# Altium PCB Lamps_buttons.PcbDoc
Units mm, origin at the board's own origin, x right, y up, seen from the top; angles counter-clockwise.
Board outline 106 x 20 mm, 2 copper layers (Top Layer, Bottom Layer), stack 1.671 mm thick; 12 components, 6 nets, 48 pads, 4 vias.
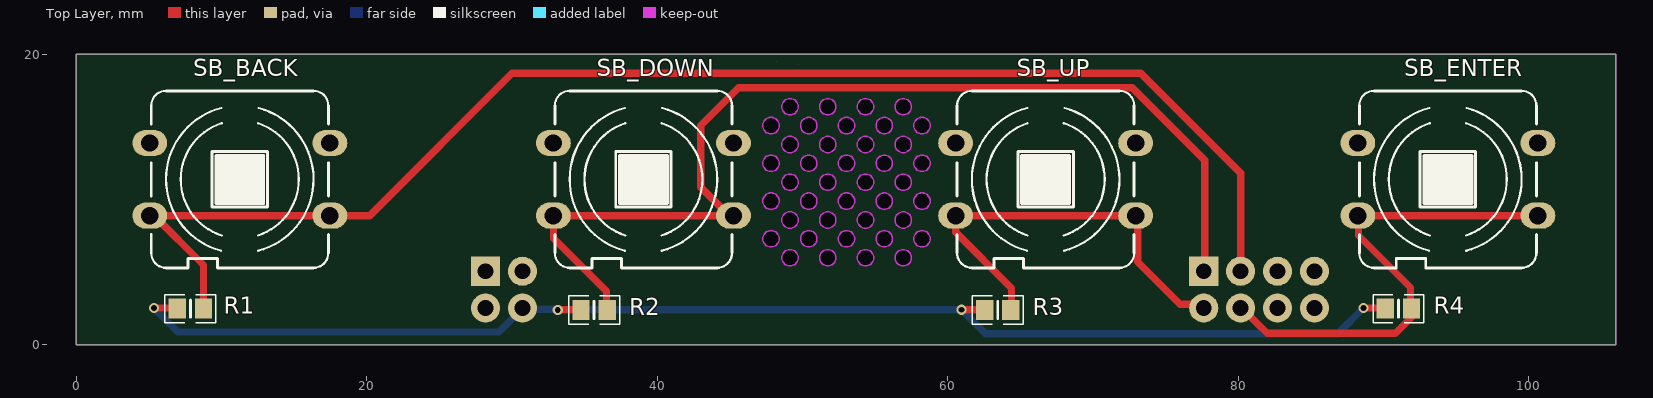
[diagram p0: Top Layer view]
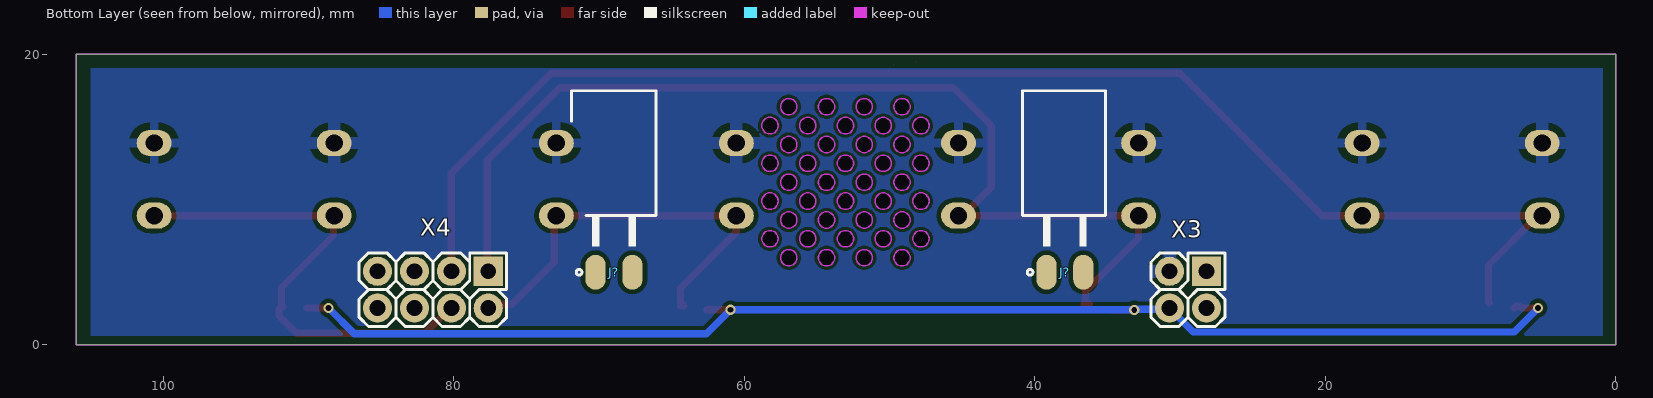
[diagram p1: Bottom Layer view, seen from below]
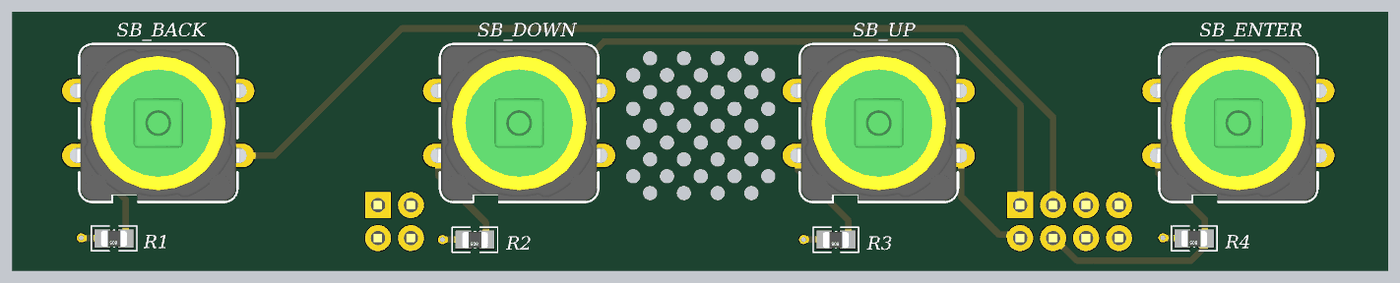
[diagram p2: 3D render of the assembled board from above, using the file's embedded part models]
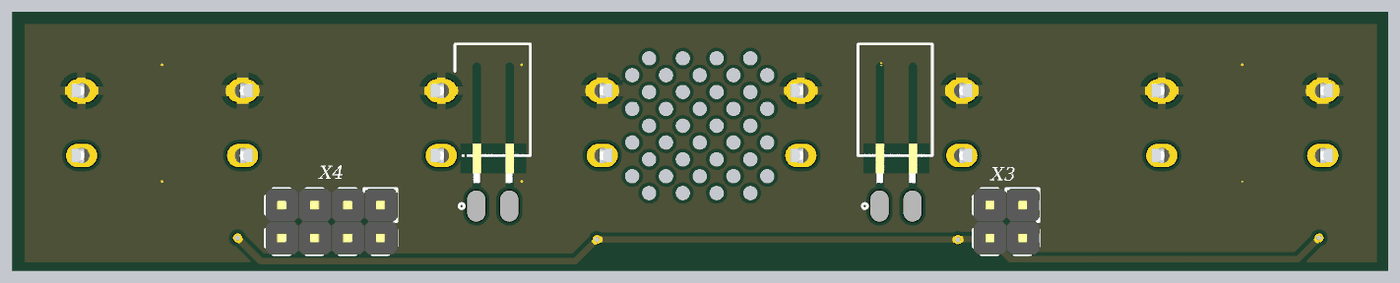
[diagram p3: 3D render of the assembled board from below, using the file's embedded part models]

## Layer stack, top to bottom
Top Solder: solder mask 0.0102, Solder Resist, Dk 3.5
Top Layer: signal copper 0.0356
Dielectric 1: dielectric 1.6, FR-4, Dk 4.8
Bottom Layer: signal copper 0.0356
Bottom Solder: solder mask 0.0102, Solder Resist, Dk 3.5

## Board outline
0,0 0,20 106,20 106,0
cut-out: 47.279,15.1 cw(c47.84,15.1) 47.84,15.66 cw(c47.84,15.1) 48.4,15.1 cw(c47.84,15.1) 47.84,14.54 cw(c47.84,15.1)
cut-out: 49.879,15.1 cw(c50.44,15.1) 50.44,15.66 cw(c50.44,15.1) 51,15.1 cw(c50.44,15.1) 50.44,14.54 cw(c50.44,15.1)
cut-out: 52.479,15.1 cw(c53.04,15.1) 53.04,15.66 cw(c53.04,15.1) 53.6,15.1 cw(c53.04,15.1) 53.04,14.54 cw(c53.04,15.1)
cut-out: 55.079,15.1 cw(c55.64,15.1) 55.64,15.66 cw(c55.64,15.1) 56.2,15.1 cw(c55.64,15.1) 55.64,14.54 cw(c55.64,15.1)
cut-out: 57.679,15.1 cw(c58.24,15.1) 58.24,15.66 cw(c58.24,15.1) 58.8,15.1 cw(c58.24,15.1) 58.24,14.54 cw(c58.24,15.1)
cut-out: 48.579,16.4 cw(c49.14,16.4) 49.14,16.96 cw(c49.14,16.4) 49.7,16.4 cw(c49.14,16.4) 49.14,15.84 cw(c49.14,16.4)
cut-out: 51.179,16.4 cw(c51.74,16.4) 51.74,16.96 cw(c51.74,16.4) 52.3,16.4 cw(c51.74,16.4) 51.74,15.84 cw(c51.74,16.4)
cut-out: 53.779,16.4 cw(c54.34,16.4) 54.34,16.96 cw(c54.34,16.4) 54.9,16.4 cw(c54.34,16.4) 54.34,15.84 cw(c54.34,16.4)
cut-out: 56.379,16.4 cw(c56.94,16.4) 56.94,16.96 cw(c56.94,16.4) 57.5,16.4 cw(c56.94,16.4) 56.94,15.84 cw(c56.94,16.4)
cut-out: 48.579,11.2 cw(c49.14,11.2) 49.14,11.76 cw(c49.14,11.2) 49.7,11.2 cw(c49.14,11.2) 49.14,10.64 cw(c49.14,11.2)
cut-out: 51.179,11.2 cw(c51.74,11.2) 51.74,11.76 cw(c51.74,11.2) 52.3,11.2 cw(c51.74,11.2) 51.74,10.64 cw(c51.74,11.2)
cut-out: 53.779,11.2 cw(c54.34,11.2) 54.34,11.76 cw(c54.34,11.2) 54.9,11.2 cw(c54.34,11.2) 54.34,10.64 cw(c54.34,11.2)
cut-out: 56.379,11.2 cw(c56.94,11.2) 56.94,11.76 cw(c56.94,11.2) 57.5,11.2 cw(c56.94,11.2) 56.94,10.64 cw(c56.94,11.2)
cut-out: 55.079,12.5 cw(c55.64,12.5) 55.64,13.06 cw(c55.64,12.5) 56.2,12.5 cw(c55.64,12.5) 55.64,11.94 cw(c55.64,12.5)
cut-out: 52.479,12.5 cw(c53.04,12.5) 53.04,13.06 cw(c53.04,12.5) 53.6,12.5 cw(c53.04,12.5) 53.04,11.94 cw(c53.04,12.5)
cut-out: 49.879,12.5 cw(c50.44,12.5) 50.44,13.06 cw(c50.44,12.5) 51,12.5 cw(c50.44,12.5) 50.44,11.94 cw(c50.44,12.5)
cut-out: 47.279,12.5 cw(c47.84,12.5) 47.84,13.06 cw(c47.84,12.5) 48.4,12.5 cw(c47.84,12.5) 47.84,11.94 cw(c47.84,12.5)
cut-out: 57.679,12.5 cw(c58.24,12.5) 58.24,13.06 cw(c58.24,12.5) 58.8,12.5 cw(c58.24,12.5) 58.24,11.94 cw(c58.24,12.5)
cut-out: 56.379,13.8 cw(c56.94,13.8) 56.94,14.36 cw(c56.94,13.8) 57.5,13.8 cw(c56.94,13.8) 56.94,13.24 cw(c56.94,13.8)
cut-out: 53.779,13.8 cw(c54.34,13.8) 54.34,14.36 cw(c54.34,13.8) 54.9,13.8 cw(c54.34,13.8) 54.34,13.24 cw(c54.34,13.8)
cut-out: 51.179,13.8 cw(c51.74,13.8) 51.74,14.36 cw(c51.74,13.8) 52.3,13.8 cw(c51.74,13.8) 51.74,13.24 cw(c51.74,13.8)
cut-out: 48.579,13.8 cw(c49.14,13.8) 49.14,14.36 cw(c49.14,13.8) 49.7,13.8 cw(c49.14,13.8) 49.14,13.24 cw(c49.14,13.8)
cut-out: 48.579,8.6 cw(c49.14,8.6) 49.14,9.16 cw(c49.14,8.6) 49.7,8.6 cw(c49.14,8.6) 49.14,8.04 cw(c49.14,8.6)
cut-out: 51.179,8.6 cw(c51.74,8.6) 51.74,9.16 cw(c51.74,8.6) 52.3,8.6 cw(c51.74,8.6) 51.74,8.04 cw(c51.74,8.6)
cut-out: 53.779,8.6 cw(c54.34,8.6) 54.34,9.16 cw(c54.34,8.6) 54.9,8.6 cw(c54.34,8.6) 54.34,8.04 cw(c54.34,8.6)
cut-out: 56.379,8.6 cw(c56.94,8.6) 56.94,9.16 cw(c56.94,8.6) 57.5,8.6 cw(c56.94,8.6) 56.94,8.04 cw(c56.94,8.6)
cut-out: 55.079,9.9 cw(c55.64,9.9) 55.64,10.46 cw(c55.64,9.9) 56.2,9.9 cw(c55.64,9.9) 55.64,9.34 cw(c55.64,9.9)
cut-out: 52.479,9.9 cw(c53.04,9.9) 53.04,10.46 cw(c53.04,9.9) 53.6,9.9 cw(c53.04,9.9) 53.04,9.34 cw(c53.04,9.9)
cut-out: 49.879,9.9 cw(c50.44,9.9) 50.44,10.46 cw(c50.44,9.9) 51,9.9 cw(c50.44,9.9) 50.44,9.34 cw(c50.44,9.9)
cut-out: 47.279,9.9 cw(c47.84,9.9) 47.84,10.46 cw(c47.84,9.9) 48.4,9.9 cw(c47.84,9.9) 47.84,9.34 cw(c47.84,9.9)
cut-out: 57.679,9.9 cw(c58.24,9.9) 58.24,10.46 cw(c58.24,9.9) 58.8,9.9 cw(c58.24,9.9) 58.24,9.34 cw(c58.24,9.9)
cut-out: 57.679,7.3 cw(c58.24,7.3) 58.24,7.86 cw(c58.24,7.3) 58.8,7.3 cw(c58.24,7.3) 58.24,6.74 cw(c58.24,7.3)
cut-out: 47.279,7.3 cw(c47.84,7.3) 47.84,7.86 cw(c47.84,7.3) 48.4,7.3 cw(c47.84,7.3) 47.84,6.74 cw(c47.84,7.3)
cut-out: 49.879,7.3 cw(c50.44,7.3) 50.44,7.86 cw(c50.44,7.3) 51,7.3 cw(c50.44,7.3) 50.44,6.74 cw(c50.44,7.3)
cut-out: 52.479,7.3 cw(c53.04,7.3) 53.04,7.86 cw(c53.04,7.3) 53.6,7.3 cw(c53.04,7.3) 53.04,6.74 cw(c53.04,7.3)
cut-out: 55.079,7.3 cw(c55.64,7.3) 55.64,7.86 cw(c55.64,7.3) 56.2,7.3 cw(c55.64,7.3) 55.64,6.74 cw(c55.64,7.3)
cut-out: 56.379,6 cw(c56.94,6) 56.94,6.56 cw(c56.94,6) 57.5,6 cw(c56.94,6) 56.94,5.44 cw(c56.94,6)
cut-out: 53.779,6 cw(c54.34,6) 54.34,6.56 cw(c54.34,6) 54.9,6 cw(c54.34,6) 54.34,5.44 cw(c54.34,6)
cut-out: 51.179,6 cw(c51.74,6) 51.74,6.56 cw(c51.74,6) 52.3,6 cw(c51.74,6) 51.74,5.44 cw(c51.74,6)
cut-out: 48.579,6 cw(c49.14,6) 49.14,6.56 cw(c49.14,6) 49.7,6 cw(c49.14,6) 49.14,5.44 cw(c49.14,6)
cut-out: 48.2,19.5
cut-out: 49.7,19.3

## Design rules (kind name [scope] priority, off if disabled: settings)
BoardOutlineClearance [All] p1: gap=0.2 ignorepadtopadclearanceinfootprint=FALSE
Clearance 3.3V [InNet('3V3')] p1: gap=0.305 ignorepadtopadclearanceinfootprint=FALSE
Clearance Sound [InPadClass('Sound')] p2: gap=0.305 ignorepadtopadclearanceinfootprint=FALSE
Clearance [All] p3: gap=0.2 ignorepadtopadclearanceinfootprint=FALSE
ComponentClearance [All] p1: gap=0.127 collisioncheckmode=3 verticalgap=0.127 showdistances=TRUE
DiffPairsRouting [All] p1: maxlimit=0.254 minlimit=0.127 mostfreqgap=0.127 toplayer_minwidth=0.127 toplayer_maxwidth=25.4 toplayer_prefwidth=0.127 bottomlayer_minwidth=0.127 bottomlayer_maxwidth=25.4 bottomlayer_prefwidth=0.127 maxuncoupledlength=12.7
Height [All] p1: minheight=0 maxheight=1816.048 prefheight=12.7
HoleSize [All] p1: absolutevalues=TRUE maxlimit=6.3 minlimit=0.3 maxpercent=80.000 minpercent=20.000
HoleToHoleClearance [All] p1: gap=0.25 allowstackedmicrovias=FALSE
MinimumAnnularRing [All] p1: minimumring=0.076
MinimumSolderMaskSliver [All] p1: minsoldermaskwidth=0
PlaneClearance [All] p1: clearance=0.127
PlaneConnect PlaneConnectPowerPads [InPadClass('PowerPads')] p1: planeconnectstyle=Direct reliefexpansion=0.508 reliefentries=4 reliefconductorwidth=0.254 reliefairgap=0.254
PlaneConnect [All] p2: pad.planeconnectstyle=Relief pad.reliefexpansion=0.3 pad.reliefentries=4 pad.reliefconductorwidth=0.127 pad.reliefairgap=0.127 via.planeconnectstyle=Direct via.reliefexpansion=0.3 via.reliefentries=4 via.reliefconductorwidth=0.127 via.reliefairgap=0.127
PolygonConnect PolygonConnectPowerPads [All vs (InPadClass('PowerPads'))] p1: connectstyle=Direct reliefconductorwidth=0.254 reliefentries=4 polygonreliefangle="90 Angle" airgapwidth=0.254
PolygonConnect [All] p2: thpad.connectstyle=Relief thpad.reliefconductorwidth=0.635 thpad.reliefentries=4 thpad.polygonreliefangle="90 Angle" thpad.airgapwidth=0.508 smdpad.connectstyle=Relief smdpad.reliefconductorwidth=0.127 smdpad.reliefentries=4 smdpad.polygonreliefangle="90 Angle" smdpad.airgapwidth=0.127 via.connectstyle=Direct via.reliefconductorwidth=0.127 via.reliefentries=4 via.polygonreliefangle="90 Angle" via.airgapwidth=0.127
RoutingVias [All] p1: holewidth=0.3 width=0.6 viastyle="Through Hole" minholewidth=0.3 minwidth=0.6 maxholewidth=0.6 maxwidth=6.6
SilkToSilkClearance [All] p1: silktosilkclearance=0
SilkToSolderMaskClearance [IsPad] p1: minsilkscreentomaskgap=0.127 clearancetoexposedcopper=TRUE
SolderMaskExpansion [All] p1: expansion=0.075
Width [All] p1: maxlimit=25.4 minlimit=0.127 preferedwidth=0.127 minimp=50.000000 maximp=50.000000 favimp=50.000000
20 further rules are at their usual default settings.

## Classes and differential pairs
pad class Sound: J?-1 J?-2 R1-1 R1-2 R2-1 R2-2 R3-1 R3-2 R4-1 R4-2 SB_BACK- SB_BACK-1 SB_BACK-2 SB_BACK-3 SB_BACK-4 SB_DOWN- SB_DOWN-1 SB_DOWN-2 SB_DOWN-3 SB_DOWN-4 SB_ENTER- SB_ENTER-1 SB_ENTER-2 SB_ENTER-3 SB_ENTER-4 SB_UP- SB_UP-1 SB_UP-2 SB_UP-3 SB_UP-4 X3-1 X3-2 X3-3 X3-4 X4-1 X4-2 X4-3 X4-4 X4-5 X4-6 X4-7 X4-8
component class Lamps_buttons: J? R1 R2 R3 R4 SB_BACK SB_DOWN SB_ENTER SB_UP X3 X4

## Components (designator, comment, footprint, x,y, rotation, side; value= is the part's Value field where it differs from the comment)
J? "HDRM2" HDRSE_M_1X2 68.98,5 r180 bottom
J? "HDRM2" HDRSE_M_1X2 37.92,5 r180 bottom
R1 "1k" RESC2012(0805)N 7.85,2.5 r180 top
R2 "1k" RESC2012(0805)N 35.65,2.4 r180 top
R3 "1k" RESC2012(0805)N 63.45,2.4 r180 top
R4 "1k" RESC2012(0805)N 91.05,2.5 r180 top
SB_BACK "EVQ-P7B01P" SWPBT_SPDT_12X12SKHC#1 11.25,11.4 r0 top
SB_DOWN "EVQ-P7B01P" SWPBT_SPDT_12X12SKHC#2 39.05,11.4 r0 top
SB_ENTER "EVQ-P7B01P" SWPBT_SPDT_12X12SKHC#2 94.45,11.4 r0 top
SB_UP "EVQ-P7B01P" SWPBT_SPDT_12X12SKHC#2 66.75,11.4 r0 top
X3 "Connector, 4pin, 2.54mm, 500VAC, 3A" "CON: PLD-4" 29.45,3.8 r0 bottom
X4 "Connector, 8pin, 2.54mm, 500VAC, 3A" "CON: PLD-8" 81.45,3.8 r0 bottom

## Footprints (in the part's own frame and the unit in brackets; to place one, negate y for a bottom-side part, rotate by r counter-clockwise, add the part's x,y. Pads: shape width x height; smd on the part's side, far side on the other; paste and mask are expansions set on the pad)
"CON: PLD-4" [mm]
  rect 2x2 hole 1.1: 1(-1.27,-1.27)
  round 2 hole 1.1: 2(-1.27,1.27) 3(1.27,-1.27) 4(1.27,1.27)
  silkscreen extent -2.54,-2.54 2.54,2.54, body extent -2.59,-2.55 2.49,2.53, height 8.54
"CON: PLD-8" [mm] "PLD-40 8 pin header"
  rect 2x2 hole 1.1: 1(-3.81,-1.27)
  round 2 hole 1.1: 2(-3.81,1.27) 3(-1.27,-1.27) 4(-1.27,1.27) 5(1.27,-1.27) 6(1.27,1.27) 7(3.81,-1.27) 8(3.81,1.27)
  silkscreen extent -5.08,-2.54 5.08,2.54, body extent -5.13,-2.55 5.03,2.53, height 8.54
HDRSE_M_1X2 [mm]
  oval 1.4x2.4 smd mask+0.1: 1(-1.27,0) 2(1.27,0)
  silkscreen extent -2.9,-0.2 2.9,12.5, body extent -2.5,-0.47 2.58,11.07, height 1.54
RESC2012(0805)N [mm] "Chip Resistor, Body 2.0x1.3mm, IPC Medium Density"
  rect 1.2x1.4 smd: 1(-0.9,0) 2(0.9,0)
  silkscreen extent -1.75,-0.97 1.75,0.97, body extent -1,-0.62 1,0.64, height 0.78
SWPBT_SPDT_12X12SKHC#1 [mm] "SWITCH, PUSHBUTTON, THD, SPDT, 12X12X7.3 mm ; 1,000,000 cycles ; 1.27N Force, SKHCBEA010"
  oval 2.4x1.8 hole 1.2 mask+0.1: 1(-6.2,2.5) 2(-6.2,-2.5) 3(6.2,-2.5) 4(6.2,2.5)
  round 0 all layers, no hole: ""(0,-4.5)
  round 0 all layers, no hole mask+0.1: ""(0,4.5)
  silkscreen extent -6.1,-6.1 6.1,6.1, body extent -7,-6 7,6, height 7.33
SWPBT_SPDT_12X12SKHC#2 [mm] "SWITCH, PUSHBUTTON, THD, SPDT, 12X12X7.3 mm ; 1,000,000 cycles ; 1.27N Force, SKHCBEA010"
  oval 2.4x1.8 hole 1.2 mask+0.1: 1(-6.2,2.5) 2(-6.2,-2.5) 3(6.2,-2.5) 4(6.2,2.5)
  round 0 all layers, no hole mask+0.1: ""(0,-4.5) ""(0,4.5)
  silkscreen extent -6.1,-6.1 6.1,6.1, body extent -7,-6 7,6, height 7.33

## Part data
J? J?: library part HDRSE_M_1X2, "CONN, HEADER, Male, pitch: 2.54mm, 2POS, SMD", ASSEMBLY=ASSEMBLY, DESC=DESCRIPTION, MANF=Sullins, MANF_P#=PBC36SAAN, PARAM=PARAM, PRICE=PRICE
R1 R2 R3 R4: library part RESC2012(0805), Package=0805, Part Number=RESC2012(0805)
SB_BACK SB_DOWN SB_ENTER SB_UP: "SWITCH TACTILE SPST-NO 0.05A 12V", Digi-Key Part Number=P16764CT-ND, Package=4pinSMD, HelpURL=https://www.digikey.com/product-detail/en/EVQ-P7B01P/P16764CT-ND/4429457/?itemSeq=274049127, Manufacturer Part Number=EVQ-P7B01P, Part Number=EVQ-P7B01P, Price$=0.16200
X3: library part PBD-4, CurrentMax=3A, Manufacturer=Connfly, VoltageMax=500VAC, CommentText="\"Разъем\"", HelpURL=https://www.chipdip.ru/product/pbd-4, Multichannel=4pin, PartNumber=PBD-4, Pitch=2.54mm, System=Connector, TypeConnector=Connector, ValueManufacturerPartNumber="Connector, 4pin, 2.54mm, 500VAC, 3A"
X4: library part PBD-8, CurrentMax=3A, Manufacturer=Connfly, VoltageMax=500VAC, CommentText="\"Разъем\"", HelpURL=https://www.chipdip.ru/product/pbd-8, Multichannel=8pin, PartNumber=PBD-8, Pitch=2.54mm, System=Connector, TypeConnector=Connector, ValueManufacturerPartNumber="Connector, 8pin, 2.54mm, 500VAC, 3A"

## Via types
v1: diameter 0.7, hole 0.4, Top Layer to Bottom Layer, 4 vias

## Nets (pads, with @x,y where several pads share a name; then routed paths per layer and width w, separated by ;. In a path a pad name is that pad's centre, name@x,y a point inside that pad or via, vN(x,y) a via of type N, cw(c..) or ccw(c..) an arc to the next point about the centre after c; other vN are vias at no path point)
3V3: R1.2 R2.2 R3.2 R4.2 X3.4 | length 92.7
  Top Layer w0.5: v1(5.33,2.54) 6.473,2.54 6.6,2.667 6.843,2.667 R1.2@6.97,2.54 ; v1(33.146,2.41) 34.78,2.41 R2.2@34.783,2.413 ; v1(60.956,2.413) R3.2@62.596,2.413 ; v1(88.642,2.54) R4.2@90.155,2.54
  Bottom Layer w0.5: v1(5.33,2.54) 6.981,0.889 29.079,0.889 30.73,2.54 30.819,2.451 33.105,2.451 v1(33.146,2.41) 60.953,2.41 v1(60.956,2.413) 62.607,0.762 86.864,0.762 v1(88.642,2.54)
GND: SB_BACK.1 SB_BACK.4 SB_DOWN.1 SB_DOWN.4 SB_ENTER.1 SB_ENTER.4 SB_UP.1 SB_UP.4 X3.3 | length 0.1
  Bottom Layer w0.5: X3.3@30.73,5.08 X3.3@30.73,5.176
SWITCH_BACK: R1.1 SB_BACK.2 SB_BACK.3 X4.3 | length 95.4
  Top Layer w0.5: SB_BACK.2 SB_BACK.2@5.35,8.9 ; R1.1@8.7,2.9 8.75,2.95 8.75,5.5 SB_BACK.2@5.35,8.9 ; SB_BACK.3@17.1,8.8 17,8.9 SB_BACK.2@5.35,8.9 ; SB_BACK.3 20.2,8.9 30,18.7 73.3,18.7 80.18,11.82 80.18,5.62 X4.3@80.2,5.6
SWITCH_DOWN: R2.1 SB_DOWN.2 SB_DOWN.3 X4.1 | length 72.7
  Top Layer w0.5: SB_DOWN.2 32.85,7.35 36.5,3.7 36.5,3.05 36.25,2.8 R2.1@36.6,2.8 ; SB_DOWN.2@32.9,8.8 33,8.9 SB_DOWN.3@44.95,8.9 ; SB_DOWN.3 SB_DOWN.3@44.95,8.9 ; X4.1@77.7,5.3 77.7,12.71 72.71,17.7 45.6,17.7 43,15.1 43,10.85 SB_DOWN.3@44.95,8.9
SWITCH_ENTER: R4.1 SB_ENTER.2 SB_ENTER.3 X4.4 | length 33.7
  Top Layer w0.5: X4.4@80.26,2.54 82,0.8 90.839,0.8 92.05,2.011 R4.1@92.05,2.5 ; R4.1@91.8,2.6 R4.1@91.95,2.6 ; R4.1@91.9,2.8 91.874,2.826 91.874,3.95 88.3,7.524 88.3,8.85 SB_ENTER.2 SB_ENTER.3
SWITCH_UP: R3.1 SB_UP.2 SB_UP.3 X4.2 | length 29.7
  Top Layer w0.5: R3.1@64.4,2.7 64.15,2.7 64.275,2.825 64.4,2.95 64.4,3.9 60.55,7.75 SB_UP.2 72.8,8.9 SB_UP.3@73,8.7 ; SB_UP.3 73.25,8.9 73.1,8.75 73.1,5.7 76,2.8 X4.2@77.4,2.8
pads on no net: J?.1 J?.2 SB_BACK. SB_DOWN. SB_ENTER. SB_UP. X3.1 X3.2 X4.5 X4.6 X4.7 X4.8

## Polygon pours and split planes (outlines as drawn)
GND on Bottom Layer "Bottom Layer-GND" (solid, remove dead copper, pour order 16): 0.885,19.05 0.885,0.635 105.025,0.635 105.025,19.05
no net on Bottom Layer "Bottom Layer-No Net" (solid, pour order 12): 1.012,15.24
no net on Top Layer "Top Layer-No Net" (solid, pour order 6): 1.52,17.78

## Keep-outs
Keep-Out Layer:
  lines w0.1: 0,0 0,20 ; 0,0 106,0 ; 0,0 106,0 ; 0,0 0,20 ; 0,20 106,20 ; 0,20 106,20 ; 106,0 106,20 ; 106,0 106,20 ; 47.279,7.189 47.365,6.983 47.522,6.825 47.728,6.74 47.951,6.74 48.157,6.825 48.315,6.983 48.4,7.189 48.4,7.3 48.4,7.411 48.315,7.617 48.157,7.775 47.951,7.86 47.728,7.86 47.522,7.775 47.365,7.617 47.279,7.411 47.279,7.3 47.279,7.189 ; 47.279,9.789 47.365,9.583 47.522,9.425 47.728,9.34 47.951,9.34 48.157,9.425 48.315,9.583 48.4,9.789 48.4,9.9 48.4,10.011 48.315,10.217 48.157,10.375 47.951,10.46 47.728,10.46 47.522,10.375 47.365,10.217 47.279,10.011 47.279,9.9 47.279,9.789 ; 47.279,12.389 47.365,12.183 47.522,12.025 47.728,11.94 47.951,11.94 48.157,12.025 48.315,12.183 48.4,12.389 48.4,12.5 48.4,12.611 48.315,12.817 48.157,12.975 47.951,13.06 47.728,13.06 47.522,12.975 47.365,12.817 47.279,12.611 47.279,12.5 47.279,12.389 ; 47.279,14.989 47.365,14.783 47.522,14.625 47.728,14.54 47.951,14.54 48.157,14.625 48.315,14.783 48.4,14.989 48.4,15.1 48.4,15.211 48.315,15.417 48.157,15.575 47.951,15.66 47.728,15.66 47.522,15.575 47.365,15.417 47.279,15.211 47.279,15.1 47.279,14.989 ; 48.579,5.889 48.665,5.683 48.822,5.525 49.028,5.44 49.251,5.44 49.457,5.525 49.615,5.683 49.7,5.889 49.7,6 49.7,6.111 49.615,6.317 49.457,6.475 49.251,6.56 49.028,6.56 48.822,6.475 48.665,6.317 48.579,6.111 48.579,6 48.579,5.889 ; 48.579,8.489 48.665,8.283 48.822,8.125 49.028,8.04 49.251,8.04 49.457,8.125 49.615,8.283 49.7,8.489 49.7,8.6 49.7,8.711 49.615,8.917 49.457,9.075 49.251,9.16 49.028,9.16 48.822,9.075 48.665,8.917 48.579,8.711 48.579,8.6 48.579,8.489 ; 48.579,11.089 48.665,10.883 48.822,10.725 49.028,10.64 49.251,10.64 49.457,10.725 49.615,10.883 49.7,11.089 49.7,11.2 49.7,11.311 49.615,11.517 49.457,11.675 49.251,11.76 49.028,11.76 48.822,11.675 48.665,11.517 48.579,11.311 48.579,11.2 48.579,11.089 ; 48.579,13.689 48.665,13.483 48.822,13.325 49.028,13.24 49.251,13.24 49.457,13.325 49.615,13.483 49.7,13.689 49.7,13.8 49.7,13.911 49.615,14.117 49.457,14.275 49.251,14.36 49.028,14.36 48.822,14.275 48.665,14.117 48.579,13.911 48.579,13.8 48.579,13.689 ; 48.579,16.289 48.665,16.083 48.822,15.925 49.028,15.84 49.251,15.84 49.457,15.925 49.615,16.083 49.7,16.289 49.7,16.4 49.7,16.511 49.615,16.717 49.457,16.875 49.251,16.96 49.028,16.96 48.822,16.875 48.665,16.717 48.579,16.511 48.579,16.4 48.579,16.289 ; 49.879,7.189 49.965,6.983 50.122,6.825 50.328,6.74 50.551,6.74 50.757,6.825 50.915,6.983 51,7.189 51,7.3 51,7.411 50.915,7.617 50.757,7.775 50.551,7.86 50.328,7.86 50.122,7.775 49.965,7.617 49.879,7.411 49.879,7.3 49.879,7.189 ; 49.879,9.789 49.965,9.583 50.122,9.425 50.328,9.34 50.551,9.34 50.757,9.425 50.915,9.583 51,9.789 51,9.9 51,10.011 50.915,10.217 50.757,10.375 50.551,10.46 50.328,10.46 50.122,10.375 49.965,10.217 49.879,10.011 49.879,9.9 49.879,9.789 ; 49.879,12.389 49.965,12.183 50.122,12.025 50.328,11.94 50.551,11.94 50.757,12.025 50.915,12.183 51,12.389 51,12.5 51,12.611 50.915,12.817 50.757,12.975 50.551,13.06 50.328,13.06 50.122,12.975 49.965,12.817 49.879,12.611 49.879,12.5 49.879,12.389 ; 49.879,14.989 49.965,14.783 50.122,14.625 50.328,14.54 50.551,14.54 50.757,14.625 50.915,14.783 51,14.989 51,15.1 51,15.211 50.915,15.417 50.757,15.575 50.551,15.66 50.328,15.66 50.122,15.575 49.965,15.417 49.879,15.211 49.879,15.1 49.879,14.989 ; 51.179,5.889 51.265,5.683 51.422,5.525 51.628,5.44 51.851,5.44 52.057,5.525 52.215,5.683 52.3,5.889 52.3,6 52.3,6.111 52.215,6.317 52.057,6.475 51.851,6.56 51.628,6.56 51.422,6.475 51.265,6.317 51.179,6.111 51.179,6 51.179,5.889 ; 51.179,8.489 51.265,8.283 51.422,8.125 51.628,8.04 51.851,8.04 52.057,8.125 52.215,8.283 52.3,8.489 52.3,8.6 52.3,8.711 52.215,8.917 52.057,9.075 51.851,9.16 51.628,9.16 51.422,9.075 51.265,8.917 51.179,8.711 51.179,8.6 51.179,8.489 ; 51.179,11.089 51.265,10.883 51.422,10.725 51.628,10.64 51.851,10.64 52.057,10.725 52.215,10.883 52.3,11.089 52.3,11.2 52.3,11.311 52.215,11.517 52.057,11.675 51.851,11.76 51.628,11.76 51.422,11.675 51.265,11.517 51.179,11.311 51.179,11.2 51.179,11.089 ; 51.179,13.689 51.265,13.483 51.422,13.325 51.628,13.24 51.851,13.24 52.057,13.325 52.215,13.483 52.3,13.689 52.3,13.8 52.3,13.911 52.215,14.117 52.057,14.275 51.851,14.36 51.628,14.36 51.422,14.275 51.265,14.117 51.179,13.911 51.179,13.8 51.179,13.689 ; 51.179,16.289 51.265,16.083 51.422,15.925 51.628,15.84 51.851,15.84 52.057,15.925 52.215,16.083 52.3,16.289 52.3,16.4 52.3,16.511 52.215,16.717 52.057,16.875 51.851,16.96 51.628,16.96 51.422,16.875 51.265,16.717 51.179,16.511 51.179,16.4 51.179,16.289 ; 52.479,7.189 52.565,6.983 52.722,6.825 52.928,6.74 53.151,6.74 53.357,6.825 53.515,6.983 53.6,7.189 53.6,7.3 53.6,7.411 53.515,7.617 53.357,7.775 53.151,7.86 52.928,7.86 52.722,7.775 52.565,7.617 52.479,7.411 52.479,7.3 52.479,7.189 ; 52.479,9.789 52.565,9.583 52.722,9.425 52.928,9.34 53.151,9.34 53.357,9.425 53.515,9.583 53.6,9.789 53.6,9.9 53.6,10.011 53.515,10.217 53.357,10.375 53.151,10.46 52.928,10.46 52.722,10.375 52.565,10.217 52.479,10.011 52.479,9.9 52.479,9.789 ; 52.479,12.389 52.565,12.183 52.722,12.025 52.928,11.94 53.151,11.94 53.357,12.025 53.515,12.183 53.6,12.389 53.6,12.5 53.6,12.611 53.515,12.817 53.357,12.975 53.151,13.06 52.928,13.06 52.722,12.975 52.565,12.817 52.479,12.611 52.479,12.5 52.479,12.389 ; 52.479,14.989 52.565,14.783 52.722,14.625 52.928,14.54 53.151,14.54 53.357,14.625 53.515,14.783 53.6,14.989 53.6,15.1 53.6,15.211 53.515,15.417 53.357,15.575 53.151,15.66 52.928,15.66 52.722,15.575 52.565,15.417 52.479,15.211 52.479,15.1 52.479,14.989 ; 53.779,5.889 53.865,5.683 54.022,5.525 54.228,5.44 54.451,5.44 54.657,5.525 54.815,5.683 54.9,5.889 54.9,6 54.9,6.111 54.815,6.317 54.657,6.475 54.451,6.56 54.228,6.56 54.022,6.475 53.865,6.317 53.779,6.111 53.779,6 53.779,5.889 ; 53.779,8.489 53.865,8.283 54.022,8.125 54.228,8.04 54.451,8.04 54.657,8.125 54.815,8.283 54.9,8.489 54.9,8.6 54.9,8.711 54.815,8.917 54.657,9.075 54.451,9.16 54.228,9.16 54.022,9.075 53.865,8.917 53.779,8.711 53.779,8.6 53.779,8.489 ; 53.779,11.089 53.865,10.883 54.022,10.725 54.228,10.64 54.451,10.64 54.657,10.725 54.815,10.883 54.9,11.089 54.9,11.2 54.9,11.311 54.815,11.517 54.657,11.675 54.451,11.76 54.228,11.76 54.022,11.675 53.865,11.517 53.779,11.311 53.779,11.2 53.779,11.089 ; 53.779,13.689 53.865,13.483 54.022,13.325 54.228,13.24 54.451,13.24 54.657,13.325 54.815,13.483 54.9,13.689 54.9,13.8 54.9,13.911 54.815,14.117 54.657,14.275 54.451,14.36 54.228,14.36 54.022,14.275 53.865,14.117 53.779,13.911 53.779,13.8 53.779,13.689 ; 53.779,16.289 53.865,16.083 54.022,15.925 54.228,15.84 54.451,15.84 54.657,15.925 54.815,16.083 54.9,16.289 54.9,16.4 54.9,16.511 54.815,16.717 54.657,16.875 54.451,16.96 54.228,16.96 54.022,16.875 53.865,16.717 53.779,16.511 53.779,16.4 53.779,16.289 ; 55.079,7.189 55.165,6.983 55.322,6.825 55.528,6.74 55.751,6.74 55.957,6.825 56.115,6.983 56.2,7.189 56.2,7.3 56.2,7.411 56.115,7.617 55.957,7.775 55.751,7.86 55.528,7.86 55.322,7.775 55.165,7.617 55.079,7.411 55.079,7.3 55.079,7.189 ; 55.079,9.789 55.165,9.583 55.322,9.425 55.528,9.34 55.751,9.34 55.957,9.425 56.115,9.583 56.2,9.789 56.2,9.9 56.2,10.011 56.115,10.217 55.957,10.375 55.751,10.46 55.528,10.46 55.322,10.375 55.165,10.217 55.079,10.011 55.079,9.9 55.079,9.789 ; 55.079,12.389 55.165,12.183 55.322,12.025 55.528,11.94 55.751,11.94 55.957,12.025 56.115,12.183 56.2,12.389 56.2,12.5 56.2,12.611 56.115,12.817 55.957,12.975 55.751,13.06 55.528,13.06 55.322,12.975 55.165,12.817 55.079,12.611 55.079,12.5 55.079,12.389 ; 55.079,14.989 55.165,14.783 55.322,14.625 55.528,14.54 55.751,14.54 55.957,14.625 56.115,14.783 56.2,14.989 56.2,15.1 56.2,15.211 56.115,15.417 55.957,15.575 55.751,15.66 55.528,15.66 55.322,15.575 55.165,15.417 55.079,15.211 55.079,15.1 55.079,14.989 ; 56.379,5.889 56.465,5.683 56.622,5.525 56.828,5.44 57.051,5.44 57.257,5.525 57.415,5.683 57.5,5.889 57.5,6 57.5,6.111 57.415,6.317 57.257,6.475 57.051,6.56 56.828,6.56 56.622,6.475 56.465,6.317 56.379,6.111 56.379,6 56.379,5.889 ; 56.379,8.489 56.465,8.283 56.622,8.125 56.828,8.04 57.051,8.04 57.257,8.125 57.415,8.283 57.5,8.489 57.5,8.6 57.5,8.711 57.415,8.917 57.257,9.075 57.051,9.16 56.828,9.16 56.622,9.075 56.465,8.917 56.379,8.711 56.379,8.6 56.379,8.489 ; 56.379,11.089 56.465,10.883 56.622,10.725 56.828,10.64 57.051,10.64 57.257,10.725 57.415,10.883 57.5,11.089 57.5,11.2 57.5,11.311 57.415,11.517 57.257,11.675 57.051,11.76 56.828,11.76 56.622,11.675 56.465,11.517 56.379,11.311 56.379,11.2 56.379,11.089 ; 56.379,13.689 56.465,13.483 56.622,13.325 56.828,13.24 57.051,13.24 57.257,13.325 57.415,13.483 57.5,13.689 57.5,13.8 57.5,13.911 57.415,14.117 57.257,14.275 57.051,14.36 56.828,14.36 56.622,14.275 56.465,14.117 56.379,13.911 56.379,13.8 56.379,13.689 ; 56.379,16.289 56.465,16.083 56.622,15.925 56.828,15.84 57.051,15.84 57.257,15.925 57.415,16.083 57.5,16.289 57.5,16.4 57.5,16.511 57.415,16.717 57.257,16.875 57.051,16.96 56.828,16.96 56.622,16.875 56.465,16.717 56.379,16.511 56.379,16.4 56.379,16.289 ; 57.679,7.189 57.765,6.983 57.922,6.825 58.128,6.74 58.351,6.74 58.557,6.825 58.715,6.983 58.8,7.189 58.8,7.3 58.8,7.411 58.715,7.617 58.557,7.775 58.351,7.86 58.128,7.86 57.922,7.775 57.765,7.617 57.679,7.411 57.679,7.3 57.679,7.189 ; 57.679,9.789 57.765,9.583 57.922,9.425 58.128,9.34 58.351,9.34 58.557,9.425 58.715,9.583 58.8,9.789 58.8,9.9 58.8,10.011 58.715,10.217 58.557,10.375 58.351,10.46 58.128,10.46 57.922,10.375 57.765,10.217 57.679,10.011 57.679,9.9 57.679,9.789 ; 57.679,12.389 57.765,12.183 57.922,12.025 58.128,11.94 58.351,11.94 58.557,12.025 58.715,12.183 58.8,12.389 58.8,12.5 58.8,12.611 58.715,12.817 58.557,12.975 58.351,13.06 58.128,13.06 57.922,12.975 57.765,12.817 57.679,12.611 57.679,12.5 57.679,12.389 ; 57.679,14.989 57.765,14.783 57.922,14.625 58.128,14.54 58.351,14.54 58.557,14.625 58.715,14.783 58.8,14.989 58.8,15.1 58.8,15.211 58.715,15.417 58.557,15.575 58.351,15.66 58.128,15.66 57.922,15.575 57.765,15.417 57.679,15.211 57.679,15.1 57.679,14.989

## Silkscreen, mask and mechanical layers (free items; w line width, h text height)
Bottom Overlay:
  lines w0.2: 66.1,8.9 70.9,8.9 ; 71.9,15.4 71.9,17.5